# Altium PCB Brightness_Sensor_V1.0.PcbDoc
Units mm, origin at the board's own origin, x right, y up, seen from the top; angles counter-clockwise.
Board outline 50.8 x 35.56 mm, 2 copper layers (Top Layer, Bottom Layer), stack 1.584 mm thick; 13 components, 5 nets, 38 pads, 12 vias.
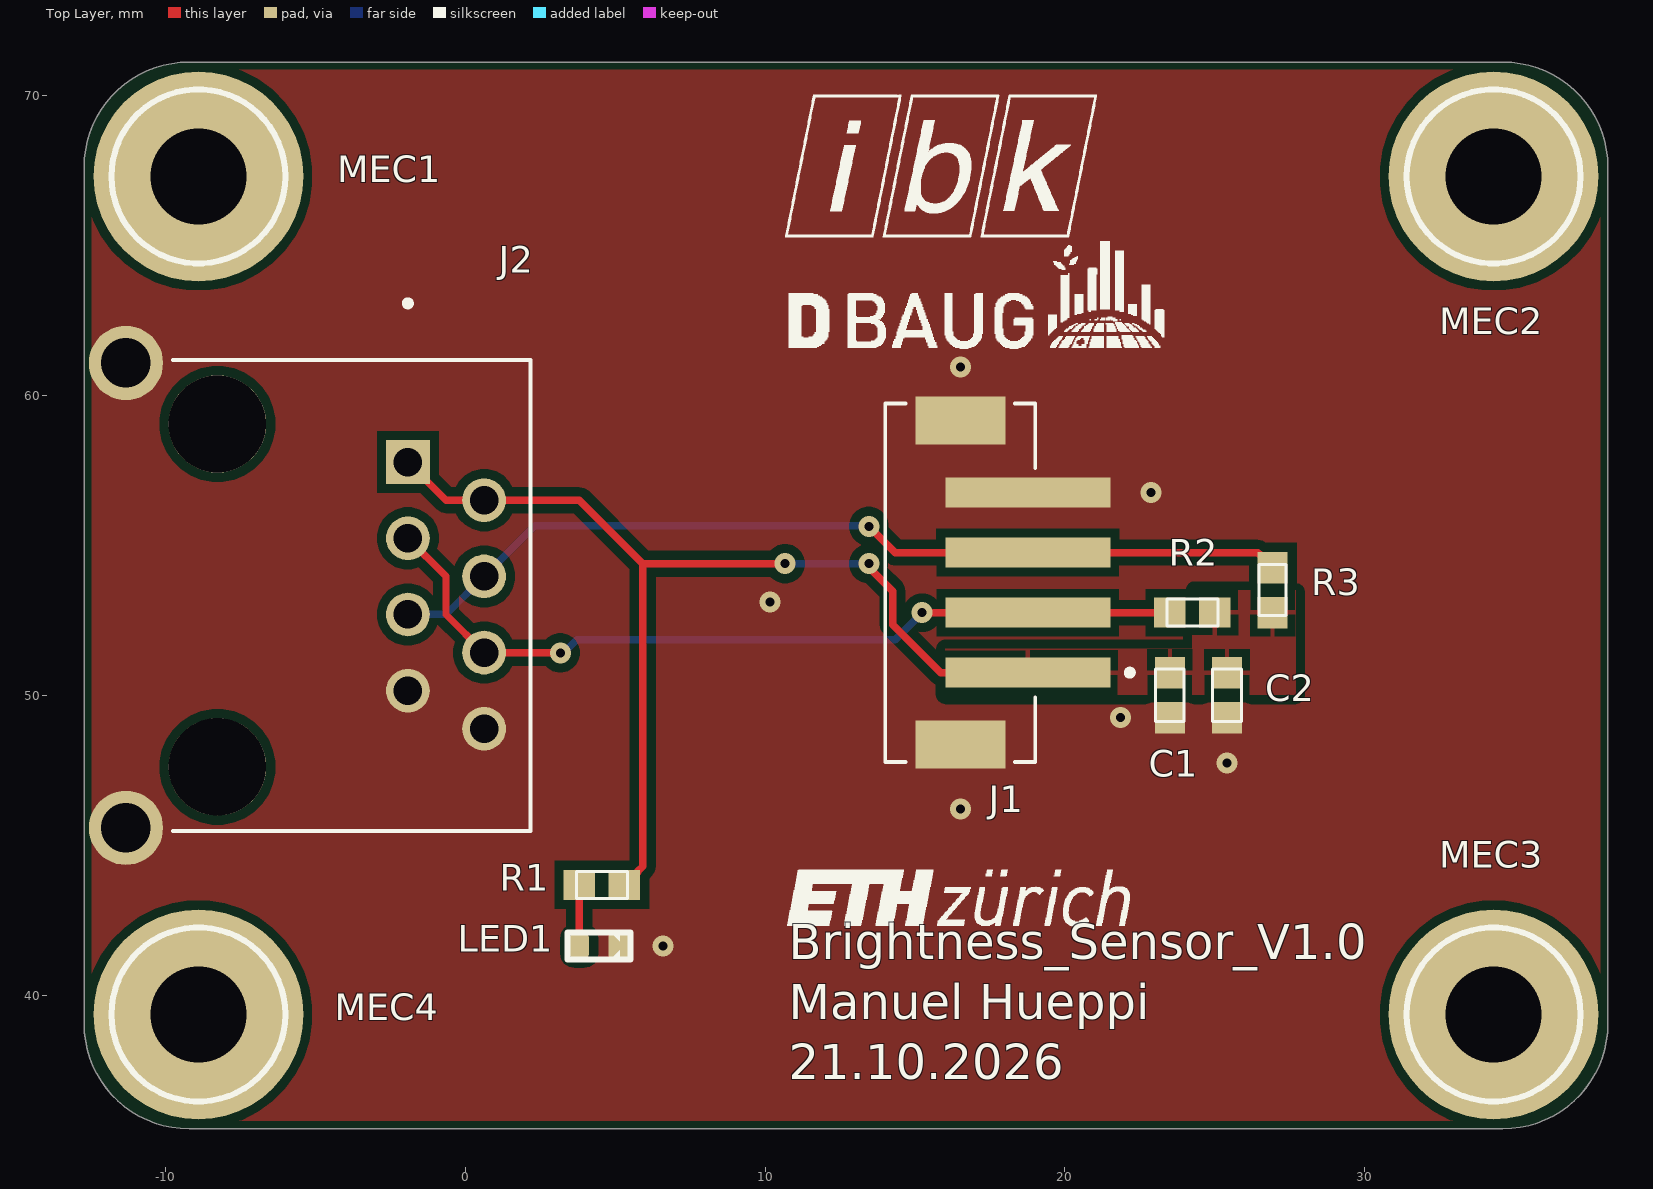
[diagram p0: Top Layer view]
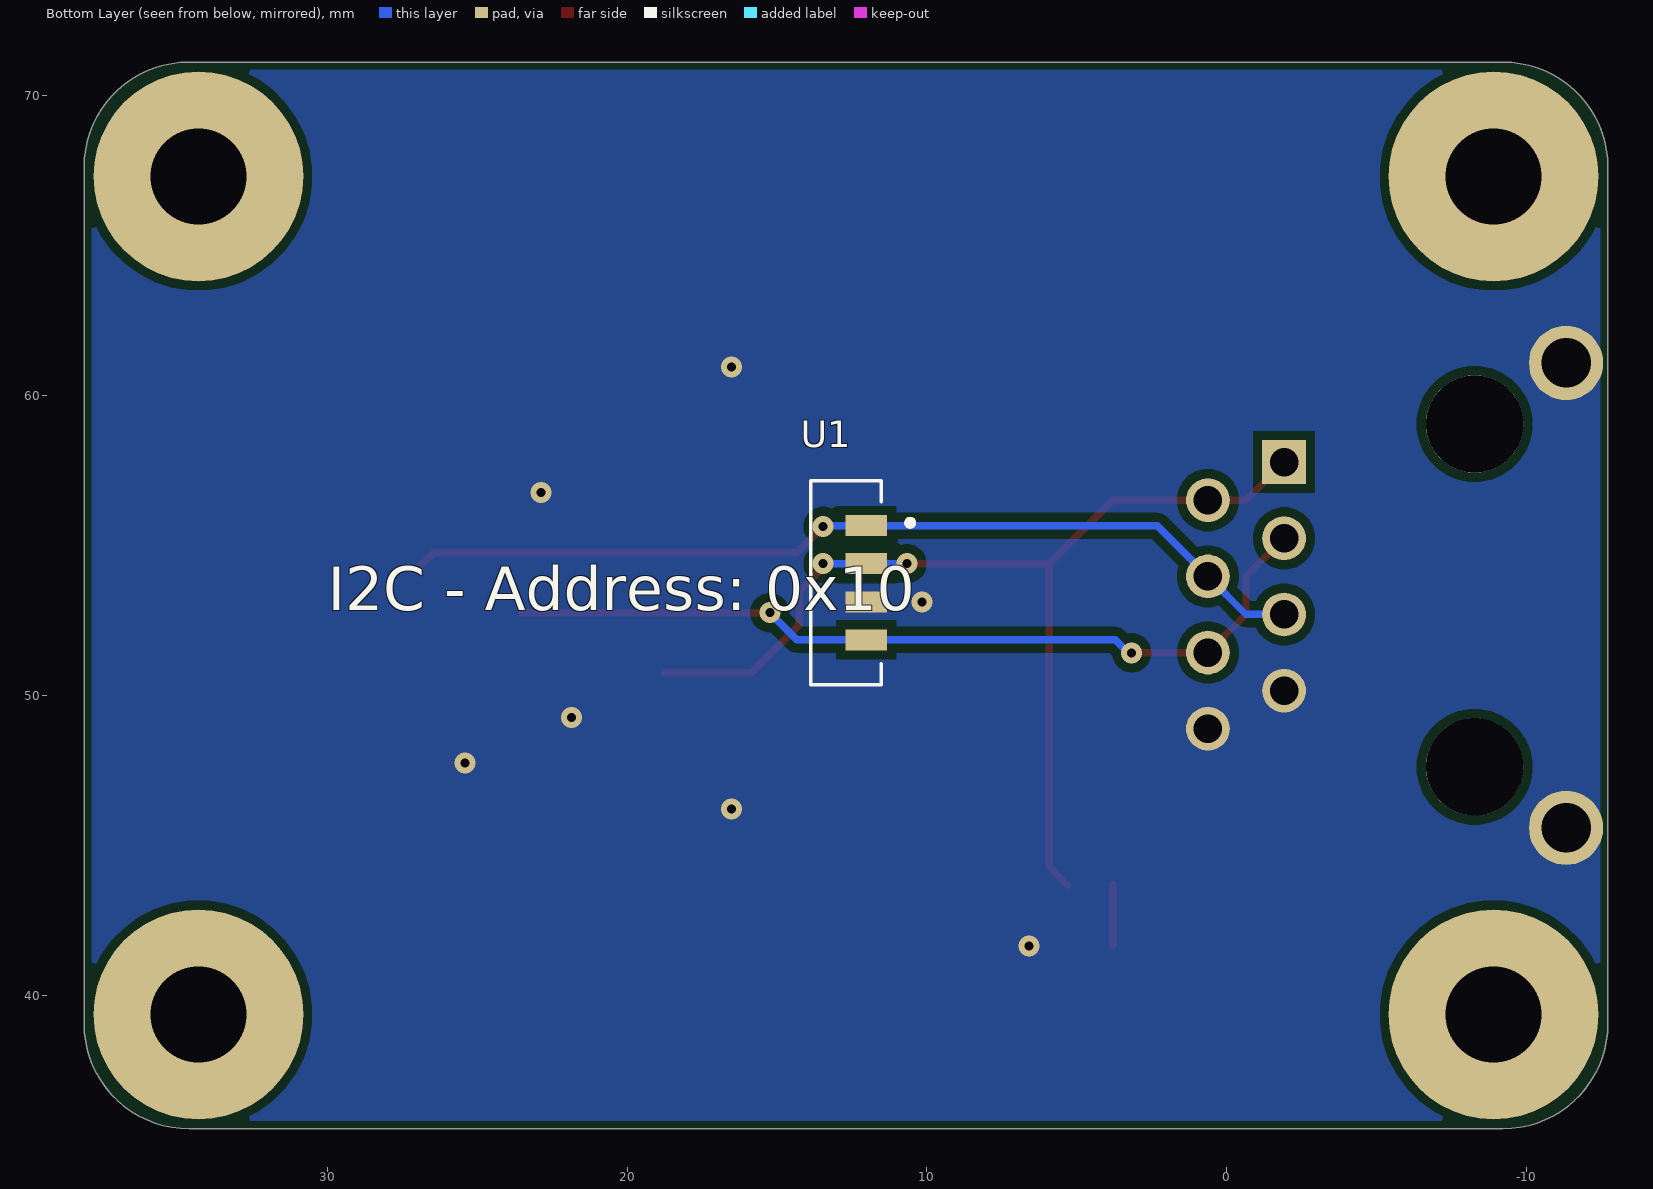
[diagram p1: Bottom Layer view, seen from below]

## Layer stack, top to bottom
Top Solder: solder mask 0.03, Solder Resist, Dk 3.5
Top Layer: signal copper 0.035
Dielectric 1: core 1.514, FR-4, Dk 4.2
Bottom Layer: signal copper 0.035
Bottom Solder: solder mask 0.03, Solder Resist, Dk 3.5

## Board outline
-12.7,39.06 -12.7,67.62 cw(c-9.2,67.62) -9.2,71.12 34.6,71.12 cw(c34.6,67.62) 38.1,67.62 38.1,39.06 cw(c34.6,39.06) 34.6,35.56 -9.2,35.56 cw(c-9.2,39.06)

## Design rules (kind name [scope] priority, off if disabled: settings)
Clearance [All] p1: gap=0.1 ignorepadtopadclearanceinfootprint=FALSE except(0: Arc-Hole Track-Hole SMDPad-Hole THPad-Hole Via-Hole Fill-Hole Poly-Hole Region-Hole Text-Hole)
DiffPairsRouting [All] p1: maxlimit=10 minlimit=0.125 mostfreqgap=0.15 toplayer_minwidth=0.381 toplayer_maxwidth=0.381 toplayer_prefwidth=0.381 bottomlayer_minwidth=0.381 bottomlayer_maxwidth=0.381 bottomlayer_prefwidth=0.381 maxuncoupledlength=12.7
FabricationTestPointUsage FabricationTestPointUsage_1 [All] p1: valid=0 allowmultiple=FALSE
FabricationTestpoint FabricationTestpoint_1 [All] p1: side=3 testpointundercomponent=TRUE minsize=1.016 maxsize=2.54 preferedsize=1.524 minholesize=0 maxholesize=1.016 preferedholesize=0.813 testpointgrid=0.025 allowsidetop=TRUE allowsidebottom=TRUE usegrid=TRUE gridtolerance=0
HoleSize [All] p1: absolutevalues=TRUE maxlimit=6 minlimit=0.1 maxpercent=80.000 minpercent=20.000
HoleSize FabricationTestpoint [All] p2 off: absolutevalues=TRUE maxlimit=2.54 minlimit=0.025 maxpercent=80.000 minpercent=20.000
HoleSize FabricationTestPointUsage [All] p3 off: absolutevalues=TRUE maxlimit=2.54 minlimit=0.025 maxpercent=80.000 minpercent=20.000
MinimumSolderMaskSliver [All] p1: minsoldermaskwidth=0.07
MinimumSolderMaskSliver SilkscreenOverComponentPads [All] p2: minsoldermaskwidth=0.254
PlaneClearance [All] p1: clearance=0.5
PlaneConnect [All] p1: planeconnectstyle=Relief reliefexpansion=0.4 reliefentries=4 reliefconductorwidth=0.15 reliefairgap=0.15
PolygonConnect [All] p1: connectstyle=Relief reliefconductorwidth=0.15 reliefentries=4 polygonreliefangle="90 Angle" airgapwidth=0.254
RoutingCorners [All] p1: cornerstyle=45-Degree minsetback=1.25 maxsetback=1.25
RoutingVias [All] p1: holewidth=0.3 width=0.6 viastyle="Through Hole" minholewidth=0.2 minwidth=0.45 maxholewidth=0.45 maxwidth=0.75
SolderMaskExpansion [All] p1: expansion=0.03 istentingtop=FALSE
Width [All] p1: maxlimit=10 minlimit=0.1 preferedwidth=0.125 minimp=50.000000 maximp=50.000000 favimp=50.000000
22 further rules are at their usual default settings.

## Classes and differential pairs
component class Brightness_Sensor_Schematic: C1 C2 J1 J2 LED1 R1 R2 R3 U1
component class Blackbox_Brightness_Sensor_Schematic: MEC1 MEC2 MEC3 MEC4

## Components (designator, comment, footprint, x,y, rotation, side; value= is the part's Value field where it differs from the comment)
C1 "10u" 0603_CAPACITOR 23.495,50.014 r90 top
C2 "100n" 0603_CAPACITOR 25.4,50.014 r90 top
J1 "B4B-PH-SM4-TB" Connector_SMD 16.51,53.764 r90 top
J2 "RJE091884511C" RJ45 -8.255,53.34 r270 top
LED1 "GREEN" "LED_0603, GREEN" 4.46,41.656 r0 top
MEC1 "Mounting Hole M3, plated" "Mounting Hole M3, plated" -8.89,67.31 r0 top
MEC2 "Mounting Hole M3, plated" "Mounting Hole M3, plated" 34.29,67.31 r0 top
MEC3 "Mounting Hole M3, plated" "Mounting Hole M3, plated" 34.29,39.37 r0 top
MEC4 "Mounting Hole M3, plated" "Mounting Hole M3, plated" -8.89,39.37 r0 top
R1 "3.3k" 0603_Resistor 4.56,43.688 r0 top
R2 "10k" 0603_Resistor 24.245,52.764 r0 top
R3 "10k" 0603_Resistor 26.924,53.514 r270 top
U1 "VEML7700-TR" Brightness_Sensor 12.7,53.764 r180 bottom

## Footprints (in the part's own frame and the unit in brackets; to place one, negate y for a bottom-side part, rotate by r counter-clockwise, add the part's x,y. Pads: shape width x height; smd on the part's side, far side on the other; paste and mask are expansions set on the pad)
0603_CAPACITOR [mm]
  rect 1.05x1 smd: 1(-0.75,0) 2(0.75,0)
  silkscreen extent -0.88,-0.48 0.87,0.48, body extent -0.88,-0.48 0.87,0.48, height 0.9
0603_Resistor [mm]
  rect 1.05x1 smd: 1(-0.75,0) 2(0.75,0)
  silkscreen extent -0.85,-0.45 0.85,0.45, body extent -0.85,-0.45 0.85,0.45, height 0.55
Brightness_Sensor [mm] "VEML7700-TR, SENSOR OPT 545NMAMB 4 SMD J LEAD."
  rect 1.4x0.7 smd: 1(0.675,1.905) 2(0.675,0.635) 3(0.675,-0.635) 4(0.675,-1.905)
  silkscreen extent -1.17,-3.4 2.24,3.4, body extent -1.5,-3.4 1.5,3.4, height 1.35
Connector_SMD [mm] "B4B-PH-SM4-TB, CONN HEADER SMD 4POS 2MM."
  rect 1x5.5 smd: 1(-3,-2.25) 2(-1,-2.25) 3(1,-2.25) 4(3,-2.25)
  rect 1.6x3 smd: SH1(-5.4,0) SH2(5.4,0)
  silkscreen extent -5.97,-5.75 5.97,2.5, body extent -5.97,-4.5 5.97,2.5, height 6.75
"LED_0603, GREEN" [mm] "LED 0603, Green, 3.2 V, 20 mA, 430 mcd"
  rrect50% 0.65x0.85 smd: A(-0.65,0)
  rect 0.65x0.85 smd: K(0.65,0)
  silkscreen extent -1.05,-0.45 1.05,0.45, body extent -0.85,-0.45 0.85,0.45, height 1.1
"Mounting Hole M3, plated" [mm] "Mounting Hole for M3 Screw, plated to connect signal"
  round 7 / inner round 5 / far side round 7 hole 3.2: 1(0,0)
  silkscreen extent -2.9,-2.9 2.9,2.9, body extent -2.25,1.2 -1.26,2.2, height 0
RJ45 [mm] "RJE091884511C, Jack Modular Connector 8p8c (RJ45, Ethernet) 90Â° Angle (Right) Shielded Cat3."
  rect 1.458x1.458 / inner round 1.458 / far side rect 1.458x1.458 hole 0.95: 1(-4.445,6.35)
  round 1.458 hole 0.95: 2(-3.175,8.89) 3(-1.905,6.35) 4(-0.635,8.89) 5(0.635,6.35) 6(1.905,8.89) 7(3.175,6.35) 8(4.445,8.89)
  round 2.475 hole 1.65: SH1(-7.75,-3.05) SH2(7.75,-3.05)
  round 3.25 hole 3.25 unplated: ""(-5.715,0) ""(5.715,0)
  silkscreen extent -9.84,-1.49 7.85,10.44, body extent -7.88,-7.74 7.88,10.46, height 13

## Part data
C1 C2: library part Capacitor, "0603"
J1: library part Connector_SMD_Small_Symbol, "CONN HEADER SMD 4POS 2MM.", ComponentLink1Description=Supplier, ComponentLink1URL=https://www.digikey.ch/en/products/detail/jst-sales-america-inc/B4B-PH-SM4-TB/926643
J2: library part RJ45, "Jack Modular Connector 8p8c (RJ45, Ethernet) 90Â° Angle (Right) Shielded Cat3.", Package=None, Check_prices=https://www.snapeda.com/parts/RJE091884511C/Amphenol/view-part/?ref=eda, MF="Amphenol ICC (Commercial Products)", MP=RJE091884511C, SnapEDA_Link=https://www.snapeda.com/parts/RJE091884511C/Amphenol/view-part/?ref=snap, System=Connector
LED1: library part "LED_0603, GREEN", "LED 0603, Green, 3.2 V, 20 mA, 430 mcd"
MEC1 MEC2 MEC3 MEC4: "Mounting Hole for M3 Screw, plated to connect signal"
R1 R2 R3: library part Resistor, "0603"
U1: library part Brightness_Sensor, "SENSOR OPT 545NMAMB 4 SMD J LEAD.", ComponentLink1Description=Supplier, ComponentLink1URL=https://www.digikey.ch/en/products/detail/vishay-semiconductor-opto-division/VEML7700-TR/5820243

## Via types
v1: diameter 0.7, hole 0.3, Top Layer to Bottom Layer, 12 vias

## Nets (pads, with @x,y where several pads share a name; then routed paths per layer and width w, separated by ;. In a path a pad name is that pad's centre, name@x,y a point inside that pad or via, vN(x,y) a via of type N, cw(c..) or ccw(c..) an arc to the next point about the centre after c; other vN are vias at no path point)
+3.3V: C1.2 C2.2 J1.1 J2.1 J2.2 R1.2 R2.2 R3.2 U1.2 | length 35.3
  Top Layer w0.25: J2.1 -0.635,56.515 J2.2 3.81,56.515 5.926,54.399 ; R1.2 5.335,43.688 5.76,44.113 5.76,44.138 5.926,44.304 5.926,54.399 ; v1(10.668,54.399) 5.926,54.399 ; v1(13.462,54.399) 13.462,54.282 14.262,53.482 14.262,52.362 15.86,50.764 J1.1
  Bottom Layer w0.25: v1(10.668,54.399) U1.2 v1(13.462,54.399)
GND: C1.1 C2.1 J1.4 J1.SH1 J1.SH2 J2.7 J2.8 J2.SH1 J2.SH2 LED1.K U1.3
  other v1: 6.604,41.656 16.51,46.228 25.4,47.752 21.844,49.264 10.16,53.129 22.86,56.764 16.51,60.96
NetLED1_A: LED1.A R1.1 | length 2
  Top Layer w0.25: LED1.A R1.1
SCL: J1.3 J2.4 J2.5 R3.1 U1.1 | length 30.7
  Top Layer w0.25: v1(13.462,55.642) 14.34,54.764 J1.3 26.424,54.764 26.474,54.714 26.499,54.714 26.924,54.289 R3.1
  Bottom Layer w0.25: J2.5 -0.635,52.705 J2.4 2.329,55.669 U1.1 12.039,55.656 13.448,55.656 v1(13.462,55.642)
SDA: J1.2 J2.3 J2.6 R2.1 U1.4 | length 28.3
  Top Layer w0.25: J2.3 -0.635,53.975 -0.635,52.705 J2.6 0.64,51.43 3.17,51.43 v1(3.175,51.426) ; v1(15.24,52.764) J1.2 R2.1
  Bottom Layer w0.25: v1(3.175,51.426) 3.297,51.426 3.73,51.859 U1.4 14.335,51.859 v1(15.24,52.764)
pads on no net: J2. MEC1.1 MEC2.1 MEC3.1 MEC4.1

## Polygon pours and split planes (outlines as drawn)
+3.3V on Top Layer "+3.3V_L01_P001" (solid, pour order 1): 16.002,51.57 24.24,51.57 24.24,53.514 27.686,53.514 27.686,50.022 16.002,50.022
GND on Top Layer "GND_L01_P009" (solid, pour order 9): -13.97,34.29 -13.97,72.39 39.37,72.39 39.37,34.29
GND on Bottom Layer "GND_L02_P002" (solid, pour order 2): -12.7,33.02 -12.7,71.12 40.64,71.12 40.64,33.02

## Silkscreen, mask and mechanical layers (free items; w line width, h text height)
Top Overlay:
  drawing of 58 lines, arcs and shapes, not listed
  text "Brightness_Sensor_V1.0 / Manuel Hueppi / 21.10.2026" at 10.795,36.83 h2
Bottom Overlay:
  text "I2C - Address: 0x10" at 29.972,52.362 h2.5
Mechanical 13:
  the board outline again, w0.254

## Text inside footprints (layer, text, board x,y; h text height)
J2: Mechanical 13 "PCB Edge" at -12.346,43.842 h0.81 r270